# Altium PCB NB3000XN.PcbDoc (part 34 of 71)
Units mil, origin at the board's own origin, x right, y up, seen from the top; angles counter-clockwise.
Board outline 9527.56 x 6929.77 mil, 6 copper layers (Top Layer, GND+SHIELD, MidLayer1, MidLayer2, P2 - 3V3+5V0, Bottom Layer), stack 62.375 mil thick; 832 components, 1027 nets, 4655 pads, 4981 vias.
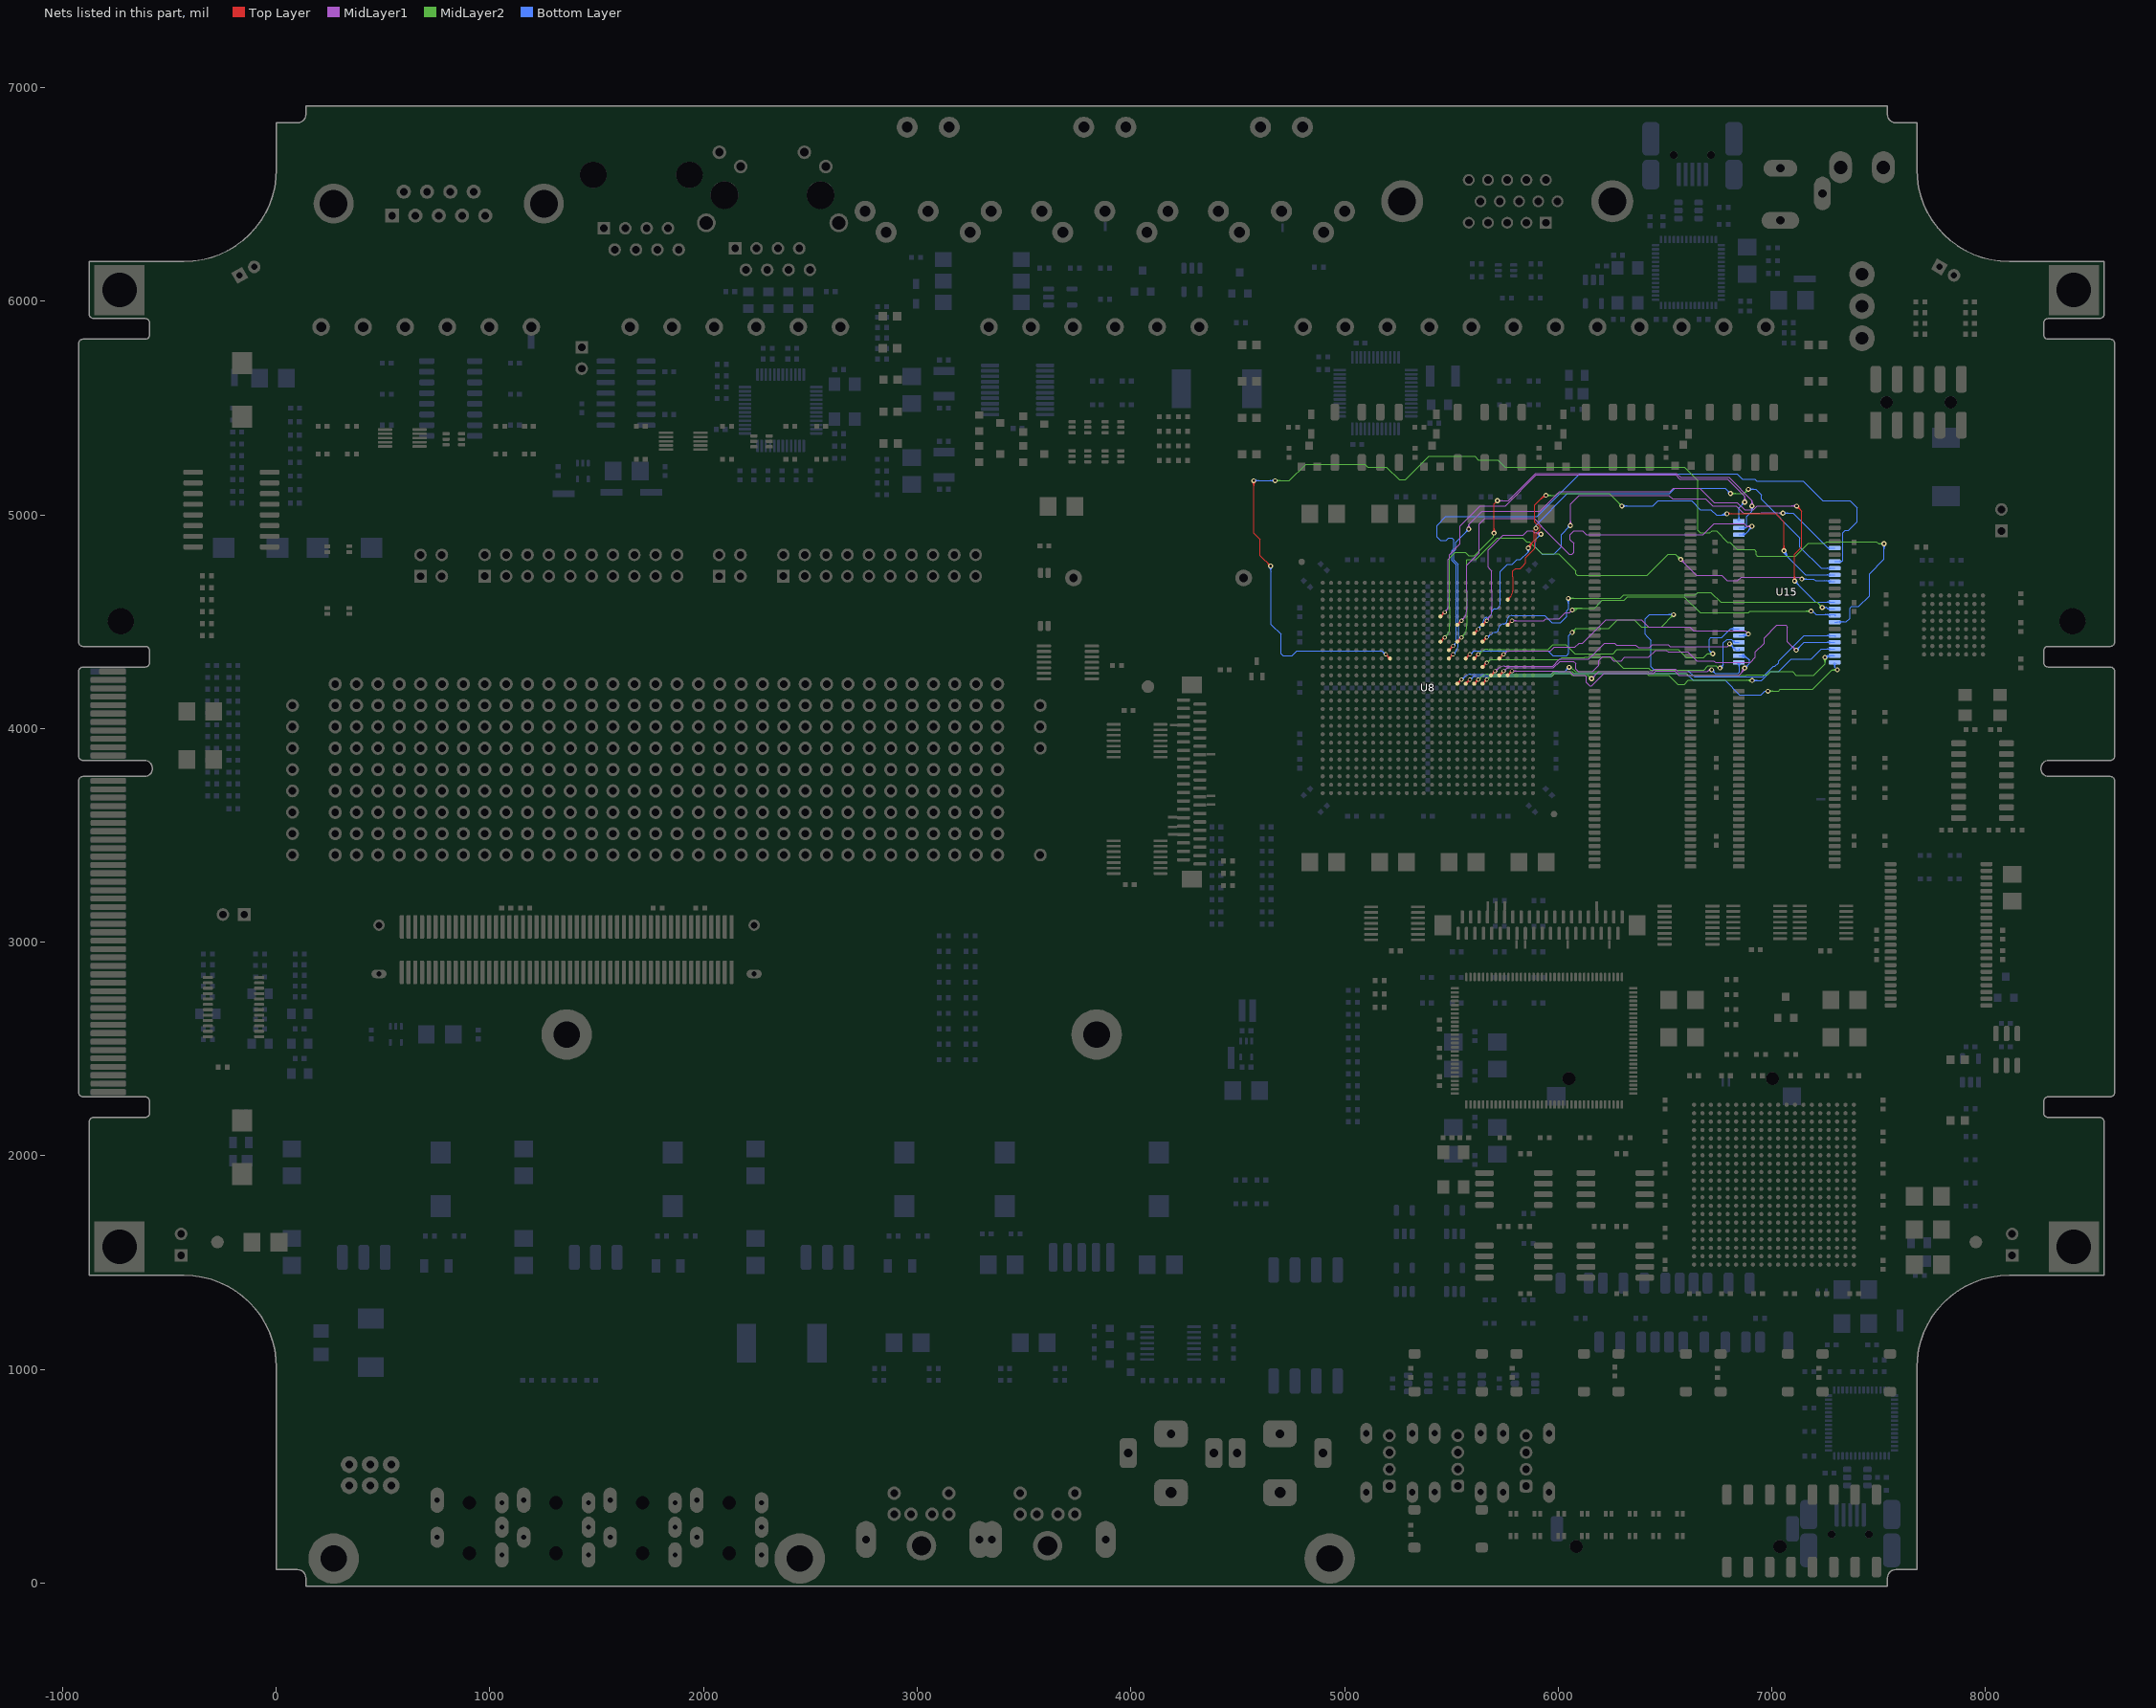
[diagram p38: the nets of this part, all layers, seen from the top]

## Via types
v1: diameter 23, hole 11.81, Top Layer to Bottom Layer, 3672 vias
v2: diameter 26, hole 11.81, Top Layer to Bottom Layer, 461 vias
v3: diameter 19, hole 11.81, Top Layer to Bottom Layer, tented both sides, 396 vias
v4: diameter 23.62, hole 11.81, Top Layer to Bottom Layer, 288 vias
v5: diameter 20, hole 11.81, Top Layer to Bottom Layer, 91 vias
v6: diameter 23, hole 11.81, Top Layer to Bottom Layer, tented both sides, 50 vias
v7: diameter 31, hole 11.81, Top Layer to Bottom Layer, 15 vias
v8: diameter 27.56, hole 11.81, Top Layer to Bottom Layer, tented both sides, 4 vias
v9: diameter 29, hole 11.81, Top Layer to Bottom Layer, 3 vias
v10: diameter 21, hole 11.81, Top Layer to Bottom Layer, 1 vias

## Nets (pads, with @x,y where several pads share a name; then routed paths per layer and width w, separated by ;. In a path a pad name is that pad's centre, name@x,y a point inside that pad or via, vN(x,y) a via of type N, cw(c..) or ccw(c..) an arc to the next point about the centre after c; other vN are vias at no path point) (continued)
DB_SRAM2.A4: U8.F20 U15.5 | length 2940.1
  Top Layer w4: U8.F20@5645.91,4485.28 v3(5665.59,4504.96) ; U8.F20@5645.91,4492.62 ccw(c5645.91,4510.34) 5658.44,4497.81 ccw(c5670.97,4485.28) U8.F20@5653.25,4485.28 ; U8.F20@5645.91,4492.78 ccw(c5645.91,4510.88) 5658.71,4498.08 ccw(c5671.51,4485.28) U8.F20@5653.41,4485.28 ; 5652.79,4492.16 cw(c5665.59,4479.35) 5665.59,4497.46 ccw(c5665.59,4479.35) 5652.79,4492.16 ; 5652.79,4492.16 ccw(c5639.98,4504.96) 5658.09,4504.96 cw(c5639.98,4504.96) 5652.79,4492.16
  MidLayer1 w4: v3@5664.29,4512.35 ccw(c5661.14,4530.18) 5675.98,4519.79 ; v3@5672.98,4506.26 cw(c5690.81,4509.41) 5675.98,4519.79 ; 5689.45,4581.77 5689.45,4567.84 ; 5896.15,4916.71 cw(c5896.15,4892.81) v1@5915.54,4906.78 ; 5903.96,4916.71 cw(c5903.96,4898.44) v1@5918.78,4909.12 ; v1@5912.29,4904.44 ccw(c5888.33,4887.17) 5888.33,4916.71 ; v1(5920,4910) 5920,4910.23 5913.52,4916.71 5888.33,4916.71 ; v1@6050.14,4956.76 ccw(c6032.37,4974.53) 6057.5,4974.53 ; v1@6052.97,4953.93 ccw(c6042.03,4964.87) 6057.5,4964.87 ; v1(6056.86,4950.04) 6057.5,4950.68 6057.5,5050.68 6098.52,5091.71 6518.17,5091.71 6534.84,5075.04 6690.19,5075.04 6723.52,5041.71 6831.86,5041.71 6865.86,5007.71 6944.52,5007.71 6948.52,5011.71 7030.04,5011.71 7033.37,5008.37 ; 6057.5,4961.77 ccw(c6068.58,4961.77) v1@6060.75,4953.93 ; 6057.5,4971.42 ccw(c6078.24,4971.42) v1@6063.57,4956.76 ; v1@7044.13,5002.85 ccw(c7033.38,4995.15) 7033.38,5008.37 ; v1@7044.13,5013.9 cw(c7033.38,5021.6) 7033.38,5008.37 ; v1(7051.86,5008.37) 7033.37,5008.37 ; 5675.98,4519.79 5683.06,4528.37 ccw(c5665.68,4544.59) 5689.45,4544.59 5689.45,4567.84 ; 5689.45,4567.84 5689.45,4641.96 5689.45,4661.38 5689.45,4710 5689.45,4720 5689.45,4724.74 5689.45,4737.45 5678.4,4748.5 5672.03,4754.87 5672.03,4835.25 5741.78,4905 5837.15,4905 5857.19,4925.04 5880,4925.04 5888.33,4916.71
  Bottom Layer w4: 5903.39,4893.62 cw(c5920,4877) v1@5920,4900.5 ; 5903.95,4894.18 ccw(c5888.13,4910) v1@5910.5,4910 ; 5910.21,4900.45 cw(c5920,4890.66) v1@5920,4904.5 ; 5910.77,4901.01 ccw(c5901.78,4910) v1@5914.5,4910 ; v1(5920,4910) 5920,4910.23 5892.61,4882.84 5892.61,4849.27 5925.17,4816.71 5979.88,4816.71 6015.52,4852.36 6015.52,4908.71 v1(6056.86,4950.04) ; v1@6047.36,4950.04 cw(c6024.42,4950.04) 6040.64,4933.82 cw(c6056.86,4917.61) v1@6056.86,4940.54 ; v1@6051.36,4950.04 cw(c6038.08,4950.04) 6047.47,4940.65 cw(c6056.86,4931.26) v1@6056.86,4944.54 ; v1(7051.86,5008.37) 7098.52,5008.37 7262.18,4844.72 ; v1@7055.75,5004.49 cw(c7065.14,4995.1) 7065.14,5008.37 cw(c7065.14,5021.65) v1@7055.75,5012.26 ; v1@7058.57,5001.66 cw(c7074.79,4985.44) 7074.79,5008.37 cw(c7074.79,5031.31) v1@7058.57,5015.09 ; U15.5@7270.13,4840.39 ccw(c7262.18,4835.27) 7262.18,4844.72 ; U15.5@7270.13,4849.06 cw(c7262.18,4854.18) 7262.18,4844.72 ; U15.5@7294.41,4844.72 7262.18,4844.72
DB_SRAM2.A5: U8.K18 U15.18 | length 2823.8
  Top Layer w4: U8.K18@5567.17,4327.8 v3(5586.85,4347.48) ; U8.K18@5567.17,4335.14 ccw(c5567.17,4352.86) 5579.7,4340.33 ccw(c5592.23,4327.8) U8.K18@5574.51,4327.8 ; U8.K18@5567.17,4335.3 ccw(c5567.17,4353.4) 5579.97,4340.6 ccw(c5592.77,4327.8) U8.K18@5574.67,4327.8 ; 5574.05,4334.68 cw(c5586.85,4321.87) 5586.85,4339.98 ccw(c5586.85,4321.87) 5574.05,4334.68 ; 5574.05,4334.68 ccw(c5561.24,4347.48) 5579.35,4347.48 cw(c5561.24,4347.48) 5574.05,4334.68
  MidLayer2 w4: v1(6065.19,4450.04) 6065.19,4451.04 6081.86,4467.71 ; v1@6065.19,4455.54 ccw(c6065.19,4466.4) 6072.87,4458.72 ; v1@6065.19,4459.54 ccw(c6065.19,4480.06) 6079.7,4465.55 ; v1@6070.69,4450.1 cw(c6085.85,4450.26) 6075.13,4460.98 ; v1@6074.69,4450.14 cw(c6099.16,4450.4) 6081.86,4467.71 ; v1@6530.69,4533.37 cw(c6507.76,4533.37) 6523.97,4517.16 cw(c6540.19,4500.94) v1@6540.19,4523.87 ; v1@6534.69,4533.37 cw(c6521.41,4533.37) 6530.8,4523.99 cw(c6540.19,4514.6) v1@6540.19,4527.87 ; v1(6540.19,4533.37) 6482.86,4476.04 6389.19,4476.04 6356.86,4508.37 6277.19,4508.37 6236.52,4467.71 6081.86,4467.71
  Bottom Layer w4: v3@5587.5,4354.95 ccw(c5589.08,4372.99) 5600.72,4359.12 ccw(c5612.36,4345.25) v3@5594.32,4346.83 ; 5600.43,4358.87 cw(c5610.36,4348.94) 5610.36,4362.99 5703.9,4362.99 5910,4362.99 5920,4362.99 5953.72,4362.99 5975,4341.71 6040.19,4341.71 6050,4351.52 6050,4434.85 v1(6065.19,4450.04) ; v1@6533.47,4526.66 ccw(c6517.26,4510.44) 6517.26,4533.37 ccw(c6517.26,4556.31) v1@6533.47,4540.09 ; v1@6536.3,4529.49 ccw(c6526.91,4520.1) 6526.91,4533.37 ccw(c6526.91,4546.65) v1@6536.3,4537.26 ; v1(6540.19,4533.37) 6428.37,4533.37 6407.72,4512.72 6407.72,4440.84 6415.23,4433.34 6435,4413.56 6435,4290 6450,4275 6604.88,4275 6637.17,4242.71 6957.86,4242.71 7006.86,4291.71 7015.19,4291.71 7031.86,4308.37 7031.86,4316.71 7141.26,4426.11 7150.42,4435.27 U15.18@7294.41,4435.27 7298.52,4435.28 7298.52,4433.37 U15.18@7294.41,4433.37 ; U15.18@7271.19,4429.62 ccw(c7257.54,4415.96) 7257.54,4435.27 ccw(c7257.54,4454.59) U15.18@7271.19,4440.93
DB_SRAM2.A6: U8.M22 U15.19 | length 2199.5
  Top Layer w4: U8.M22@5724.65,4249.06 v3(5744.33,4268.74) ; U8.M22@5724.65,4256.4 ccw(c5724.65,4274.12) 5737.18,4261.59 ccw(c5749.71,4249.06) U8.M22@5731.99,4249.06 ; U8.M22@5724.65,4256.56 ccw(c5724.65,4274.66) 5737.45,4261.86 ccw(c5750.25,4249.06) U8.M22@5732.15,4249.06 ; 5731.53,4255.94 cw(c5744.33,4243.13) 5744.33,4261.24 ccw(c5744.33,4243.13) 5731.53,4255.94 ; 5731.53,4255.94 ccw(c5718.72,4268.74) 5736.83,4268.74 cw(c5718.72,4268.74) 5731.53,4255.94
  MidLayer1 w4: v3@5744.98,4276.21 ccw(c5746.56,4294.25) 5758.2,4280.38 ccw(c5769.84,4266.51) v3@5751.8,4268.09 ; 5757.91,4280.13 cw(c5767.84,4270.2) 5767.84,4284.25 5861.38,4284.25 5910,4284.25 5920,4284.25 5978.06,4284.25 6007.86,4314.04 6072.52,4314.04 6081.86,4304.71 6081.86,4278.02 6093.5,4266.37 6161.19,4266.37 6190.19,4295.37 6190.19,4319.69 6205.5,4335 ; 6205.5,4335.71 6240.84,4335.71 6260.17,4316.37 6295.21,4316.37 6312.21,4333.37 6423.52,4333.37 6456.86,4366.71 6506.86,4366.71 6515.19,4358.37 6606.63,4358.37 6648.29,4316.71 6728.29,4316.71 6735.63,4309.37 6899.52,4309.37 6923.52,4333.37 6923.52,4358.37 6965.19,4400.04 6965.19,4425.04 7023.52,4483.37 7065.19,4483.37 7073.52,4475.04 7073.52,4407.04 v1(7113.86,4366.71) ; v1@7104.36,4366.71 ccw(c7081.42,4366.71) 7097.64,4382.93 ccw(c7113.86,4399.14) v1@7113.86,4376.21 ; v1@7108.36,4366.71 ccw(c7095.08,4366.71) 7104.47,4376.1 ccw(c7113.86,4385.49) v1@7113.86,4372.21
  Bottom Layer w4: v1(7113.86,4366.71) 7150.93,4403.78 U15.19@7293.97,4403.78 ; v1@7113.86,4372.21 ccw(c7113.86,4385.49) 7123.25,4376.1 ccw(c7132.64,4366.71) v1@7119.36,4366.71 ; v1@7113.86,4376.21 ccw(c7113.86,4399.14) 7130.07,4382.93 ccw(c7146.29,4366.71) v1@7123.36,4366.71 ; U15.19@7271.19,4398.12 ccw(c7257.54,4384.46) 7257.54,4403.78 ccw(c7257.54,4423.09) U15.19@7271.19,4409.44 ; U15.19@7293.97,4403.78 U15.19@7294.41,4403.78 U15.19@7293.97,4403.78
DB_SRAM2.A7: U8.N19 U15.20 | length 2062.7
  Top Layer w4: U8.N19@5606.54,4209.69 v3(5626.22,4229.37) ; U8.N19@5606.54,4217.03 ccw(c5606.54,4234.75) 5619.07,4222.22 ccw(c5631.6,4209.69) U8.N19@5613.88,4209.69 ; U8.N19@5606.54,4217.19 ccw(c5606.54,4235.29) 5619.34,4222.49 ccw(c5632.14,4209.69) U8.N19@5614.04,4209.69 ; 5613.42,4216.57 cw(c5626.22,4203.76) 5626.22,4221.87 ccw(c5626.22,4203.76) 5613.42,4216.57 ; 5613.42,4216.57 ccw(c5600.61,4229.37) 5618.72,4229.37 cw(c5600.61,4229.37) 5613.42,4216.57
  MidLayer2 w4: v3@5626.87,4236.84 ccw(c5628.45,4254.88) 5640.09,4241.01 ; v3@5633.69,4228.72 cw(c5651.73,4227.14) 5640.09,4241.01 ; 6422.96,4250 6422.92,4250.04 ; 6882.51,4226.04 cw(c6882.51,4199.69) v1@6901.14,4218.32 ; 6887.34,4226.04 ccw(c6887.34,4245.56) v1@6901.14,4231.76 ; 6892.16,4226.04 cw(c6892.16,4209.35) v1@6903.97,4221.15 ; v1(6907.86,4225.04) 6906.86,4226.04 6608.86,4226.04 6590.19,4207.37 6560.52,4207.37 6517.86,4250.04 6422.92,4250.04 ; 5640.09,4241.01 cw(c5669.6,4211.5) 5669.6,4253.23 5689.1,4253.23 5763.22,4253.23 5782.64,4253.23 5910,4253.23 5920,4253.23 5968.54,4253.23 5982.02,4266.71 6065.19,4266.71 6073.52,4258.37 6414.58,4258.37 6422.92,4250.04
  Bottom Layer w4: v1(6907.86,4225.04) 6952.19,4225.04 6993.52,4266.37 7031.52,4266.37 7090.19,4325.04 7184.62,4325.04 7231.86,4372.28 U15.20@7294.41,4372.28 ; v1@6911.75,4221.15 cw(c6921.14,4211.76) 6921.14,4225.04 cw(c6921.14,4238.32) v1@6911.75,4228.93 ; v1@6914.57,4218.32 cw(c6930.79,4202.11) 6930.79,4225.04 cw(c6930.79,4247.98) v1@6914.57,4231.76 ; U15.20@7271.19,4366.63 ccw(c7257.54,4352.97) 7257.54,4372.28 ccw(c7257.54,4391.6) U15.20@7271.19,4377.94
DB_SRAM2.A8: U8.N17 U15.21 | length 2255.6
  Top Layer w4: U8.N17@5527.8,4209.69 v3(5547.48,4229.37) ; U8.N17@5527.8,4217.03 ccw(c5527.8,4234.75) 5540.33,4222.22 ccw(c5552.86,4209.69) U8.N17@5535.14,4209.69 ; U8.N17@5527.8,4217.19 ccw(c5527.8,4235.29) 5540.6,4222.49 ccw(c5553.4,4209.69) U8.N17@5535.3,4209.69 ; 5534.68,4216.57 cw(c5547.48,4203.76) 5547.48,4221.87 ccw(c5547.48,4203.76) 5534.68,4216.57 ; 5534.68,4216.57 ccw(c5521.87,4229.37) 5539.98,4229.37 cw(c5521.87,4229.37) 5534.68,4216.57
  MidLayer2 w4: v1(6051.52,4287.04) 6059.19,4287.04 6079.52,4266.71 6370,4266.71 6417.56,4266.71 6425.9,4258.37 6599.86,4258.37 6609.86,4248.37 6879.52,4248.37 6881.86,4250.71 6977.86,4250.71 6993.86,4266.71 7096.19,4266.71 7112.86,4250.04 7195.19,4250.04 7248.52,4303.37 v1(7248.52,4333.37) ; v1@7241.81,4326.66 cw(c7225.59,4310.44) 7248.52,4310.44 cw(c7271.46,4310.44) v1@7255.24,4326.66 ; v1@7244.64,4329.49 cw(c7235.25,4320.1) 7248.52,4320.1 cw(c7261.8,4320.1) v1@7252.41,4329.49
  Bottom Layer w4: v3@5548.13,4236.84 ccw(c5549.71,4254.88) 5561.35,4241.01 ; v3@5554.95,4228.72 cw(c5572.99,4227.14) 5561.35,4241.01 ; v1@6042.02,4287.04 cw(c6019.09,4287.04) 6035.31,4270.82 cw(c6051.52,4254.61) v1@6051.52,4277.54 ; v1@6046.02,4287.04 cw(c6032.75,4287.04) 6042.13,4277.65 cw(c6051.52,4268.26) v1@6051.52,4281.54 ; v1(6051.52,4287.04) 6031.19,4266.71 5978.88,4266.71 5965.4,4253.23 5920,4253.23 5910,4253.23 5703.9,4253.23 5684.48,4253.23 5610.36,4253.23 5590.86,4253.23 ccw(c5590.86,4211.5) 5561.35,4241.01 ; v1@7246.76,4335.14 cw(c7260.38,4321.52) 7260.38,4340.79 ; v1(7248.52,4333.37) 7255.94,4340.79 U15.21@7294.41,4340.79 ; v1@7249.58,4332.31 cw(c7270.04,4311.86) U15.21@7270.04,4340.79 ; v1@7252.41,4329.49 cw(c7279.7,4302.2) U15.21@7279.7,4340.79 ; v1@7255.24,4326.66 cw(c7289.35,4292.55) U15.21@7289.35,4340.79 ; U15.21@7271.19,4335.13 ccw(c7257.54,4321.47) 7257.54,4340.79 ccw(c7257.54,4360.1) U15.21@7271.19,4346.44
DB_SRAM2.A9: U8.N18 U15.22 | length 2155.8
  Top Layer w4: U8.N18@5567.17,4209.69 v3(5586.85,4229.37) ; U8.N18@5567.17,4217.03 ccw(c5567.17,4234.75) 5579.7,4222.22 ccw(c5592.23,4209.69) U8.N18@5574.51,4209.69 ; U8.N18@5567.17,4217.19 ccw(c5567.17,4235.29) 5579.97,4222.49 ccw(c5592.77,4209.69) U8.N18@5574.67,4209.69 ; 5574.05,4216.57 cw(c5586.85,4203.76) 5586.85,4221.87 ccw(c5586.85,4203.76) 5574.05,4216.57 ; 5574.05,4216.57 ccw(c5561.24,4229.37) 5579.35,4229.37 cw(c5561.24,4229.37) 5574.05,4216.57
  MidLayer2 w4: v1(6981.86,4175.04) 7031.67,4175.04 7040,4183.37 7190.19,4183.37 7281.86,4275.04 v1(7306.86,4275.04) ; v1@6985.75,4171.15 cw(c6995.14,4161.76) 6995.14,4175.04 cw(c6995.14,4188.32) v1@6985.75,4178.93 ; v1@6988.57,4168.32 cw(c7004.79,4152.11) 7004.79,4175.04 cw(c7004.79,4197.98) v1@6988.57,4181.76 ; v1@7300.14,4268.32 ccw(c7283.92,4252.11) 7283.92,4275.04 ccw(c7283.92,4297.98) v1@7300.14,4281.76 ; v1@7302.97,4271.15 ccw(c7293.58,4261.76) 7293.58,4275.04 ccw(c7293.58,4288.32) v1@7302.97,4278.93
  Bottom Layer w4: v3@5587.5,4236.84 ccw(c5589.08,4254.88) 5600.72,4241.01 ccw(c5612.36,4227.14) v3@5594.32,4228.72 ; 5600.43,4240.76 cw(c5610.36,4230.83) 5610.36,4244.88 5703.9,4244.88 5910,4244.88 5920,4244.88 5924.74,4244.88 5968.36,4244.88 5981.86,4258.37 6598.88,4258.37 6631.21,4226.04 6780.86,4226.04 6848.52,4158.37 6950,4158.37 6966.67,4175.04 v1(6981.86,4175.04) ; U15.22@7288.75,4303.63 cw(c7275.1,4289.98) 7294.41,4289.98 cw(c7313.72,4289.98) U15.22@7300.07,4303.63 ; U15.22@7294.41,4309.29 7294.41,4287.49 v1(7306.86,4275.04)
DB_SRAM2.A10: U8.N20 U15.23 | length 1706.8
  Top Layer w4: U8.N20@5645.91,4209.69 v3(5665.59,4229.37) ; U8.N20@5645.91,4217.03 ccw(c5645.91,4234.75) 5658.44,4222.22 ccw(c5670.97,4209.69) U8.N20@5653.25,4209.69 ; U8.N20@5645.91,4217.19 ccw(c5645.91,4235.29) 5658.71,4222.49 ccw(c5671.51,4209.69) U8.N20@5653.41,4209.69 ; 5652.79,4216.57 cw(c5665.59,4203.76) 5665.59,4221.87 ccw(c5665.59,4203.76) 5652.79,4216.57 ; 5652.79,4216.57 ccw(c5639.98,4229.37) 5658.09,4229.37 cw(c5639.98,4229.37) 5652.79,4216.57
  MidLayer1 w4: v1(6156.86,4233.37) 6190.19,4266.71 6441.71,4266.71 6453.54,4278.54 6548.01,4278.54 6559.84,4266.71 6698.52,4266.71 6706.86,4275.04 v1(6718.19,4275.04) ; v1@6156.86,4238.87 ccw(c6156.86,4252.15) 6166.25,4242.76 ccw(c6175.64,4233.37) v1@6162.36,4233.37 ; v1@6156.86,4242.87 ccw(c6156.86,4265.81) 6173.07,4249.59 ccw(c6189.29,4233.37) v1@6166.36,4233.37 ; 6697.35,4265.53 cw(c6710.29,4252.6) v1@6716.36,4269.85 ; 6701.84,4270.02 cw(c6712.63,4259.24) v1@6717.69,4273.63 ; 6706.33,4274.52 cw(c6714.97,4265.88) v1@6719.02,4277.4
  MidLayer2 w4: v3@5666.24,4236.84 ccw(c5667.82,4254.88) 5679.46,4241.01 ccw(c5691.1,4227.14) v3@5673.06,4228.72 ; 5679.17,4240.76 cw(c5689.1,4230.83) 5689.1,4244.88 5782.64,4244.88 5910,4244.88 5920,4244.88 5971.5,4244.88 5985,4258.37 6056.86,4258.37 6065.19,4250.04 6115,4250.04 6140.23,4250 v1(6156.86,4233.37) ; v1@6147.36,4233.37 ccw(c6124.42,4233.37) 6140.64,4249.59 ccw(c6156.86,4265.81) v1@6156.86,4242.87 ; v1@6151.36,4233.37 ccw(c6138.08,4233.37) 6147.47,4242.76 ccw(c6156.86,4252.15) v1@6156.86,4238.87
  Bottom Layer w4: v1@6718.19,4265.54 cw(c6718.19,4242.61) 6734.41,4258.82 cw(c6750.63,4275.04) v1@6727.69,4275.04 ; v1@6718.19,4269.54 cw(c6718.19,4256.26) 6727.58,4265.65 cw(c6736.97,4275.04) v1@6723.69,4275.04 ; v1(6718.19,4275.04) 6734.52,4258.71 6841.29,4258.71 6848.52,4265.94 6848.52,4309.29 U15.23@6845.59,4309.29 ; U15.23@6839.93,4303.63 cw(c6819.19,4282.89) 6848.52,4282.89 ; U15.23@6842.76,4306.46 cw(c6828.85,4292.55) 6848.52,4292.55 ; 6848.52,4297.06 cw(c6857.82,4297.06) U15.23@6851.25,4303.63
DB_SRAM2.A11: U8.M23 U15.24 | length 1719.9
  Top Layer w4: U8.M23@5764.02,4249.06 v3(5783.7,4268.74) ; U8.M23@5764.02,4256.4 ccw(c5764.02,4274.12) 5776.55,4261.59 ccw(c5789.08,4249.06) U8.M23@5771.36,4249.06 ; U8.M23@5764.02,4256.56 ccw(c5764.02,4274.66) 5776.82,4261.86 ccw(c5789.62,4249.06) U8.M23@5771.52,4249.06 ; 5770.9,4255.94 cw(c5783.7,4243.13) 5783.7,4261.24 ccw(c5783.7,4243.13) 5770.9,4255.94 ; 5770.9,4255.94 ccw(c5758.09,4268.74) 5776.2,4268.74 cw(c5758.09,4268.74) 5770.9,4255.94
  MidLayer1 w4: v3(5783.7,4268.74) 5861.38,4268.74 5910,4268.74 5920,4268.74 5997.97,4268.74 6000,4266.71 6053.86,4266.71 6070.52,4250.04 6123.86,4250.04 6131.86,4242.04 6131.86,4216.71 6148.52,4200.04 6156.86,4200.04 6215.19,4258.37 6444.69,4258.37 6456.85,4270.54 6544.7,4270.54 6545.52,4269.71 6565.19,4250.04 6846.86,4250.04 6873.52,4276.71 v1(6873.52,4283.37) ; v3@5788.89,4263.55 cw(c5801.43,4251.01) 5801.43,4268.74 cw(c5801.43,4286.47) v3@5788.89,4273.93 ; v3@5789,4263.44 cw(c5801.81,4250.63) 5801.81,4268.74 cw(c5801.81,4286.85) v3@5789,4274.04 ; 6852.59,4255.78 ccw(c6824.99,4283.37) v1@6864.02,4283.37 ; 6859.42,4262.6 ccw(c6838.65,4283.37) v1@6868.02,4283.37 ; 6866.25,4269.43 ccw(c6852.31,4283.37) v1@6872.02,4283.37 ; 6868.69,4271.87 cw(c6873.52,4267.04) v1@6873.52,4273.87
  Bottom Layer w4: U15.24@6845.59,4340.79 6874.21,4340.79 6895,4320 6895,4304.85 v1(6873.52,4283.37) ; U15.24@6863.15,4332.79 cw(c6863.15,4286.76) 6895.69,4319.31 ; U15.24@6863.15,4336.79 cw(c6863.15,4300.42) 6888.86,4326.14 ; U15.24@6863.15,4340.79 cw(c6863.15,4314.08) 6882.04,4332.96 ; U15.24@6863.15,4344.79 cw(c6863.15,4327.73) 6875.21,4339.79 ; v1@6873.52,4288.87 ccw(c6873.52,4302.15) 6882.91,4292.76 ccw(c6892.3,4283.37) v1@6879.02,4283.37 ; v1@6873.52,4292.87 ccw(c6873.52,4315.81) 6889.74,4299.59 ccw(c6905.96,4283.37) v1@6883.02,4283.37
DB_SRAM2.A12: U8.M21 U15.25 | length 1505.3
  Top Layer w4: U8.M21@5685.28,4249.06 v3(5704.96,4268.74) ; U8.M21@5685.28,4256.4 ccw(c5685.28,4274.12) 5697.81,4261.59 ccw(c5710.34,4249.06) U8.M21@5692.62,4249.06 ; U8.M21@5685.28,4256.56 ccw(c5685.28,4274.66) 5698.08,4261.86 ccw(c5710.88,4249.06) U8.M21@5692.78,4249.06 ; 5692.16,4255.94 cw(c5704.96,4243.13) 5704.96,4261.24 ccw(c5704.96,4243.13) 5692.16,4255.94 ; 5692.16,4255.94 ccw(c5679.35,4268.74) 5697.46,4268.74 cw(c5679.35,4268.74) 5692.16,4255.94
  MidLayer1 w4: v3@5705.61,4276.21 ccw(c5707.19,4294.25) 5718.83,4280.38 ; v3@5712.43,4268.09 cw(c5730.47,4266.51) 5718.83,4280.38 ; 5781.77,4292.6 5767.84,4292.6 ; v1(6802.19,4396.71) 6802.19,4391.71 6793.69,4383.21 6524.3,4383.21 6515.8,4391.71 6441.88,4391.71 6428.54,4378.37 6375.84,4378.37 6363.17,4391.04 6273.52,4391.04 6265.19,4399.37 6217.5,4399.37 6143.17,4325.04 6007.52,4325.04 5975.09,4292.6 5920,4292.6 5910,4292.6 5861.38,4292.6 5841.96,4292.6 5767.84,4292.6 ; 5718.83,4280.38 cw(c5748.34,4250.87) 5748.34,4292.6 5767.84,4292.6
  Bottom Layer w4: v1@6802.19,4387.21 cw(c6802.19,4364.27) 6818.41,4380.49 cw(c6834.63,4396.71) v1@6811.69,4396.71 ; v1@6802.19,4391.21 cw(c6802.19,4377.93) 6811.58,4387.32 cw(c6820.97,4396.71) v1@6807.69,4396.71 ; v1(6802.19,4396.71) 6832.19,4366.71 6845.59,4366.71 6848.52,4366.71 6848.52,4372.28 U15.25@6845.59,4372.28 ; 6811.96,4386.94 ccw(c6828.03,4403.02) U15.25@6828.03,4380.28 ; 6815.38,4383.52 cw(c6804.14,4372.28) U15.25@6820.03,4372.28 ; 6818.79,4380.11 ccw(c6828.03,4389.36) U15.25@6828.03,4376.28
DB_SRAM2.A13: U8.L20 U15.26 | length 1585.2
  Top Layer w4: U8.L20@5645.91,4288.43 v3(5665.59,4308.11) ; U8.L20@5645.91,4295.77 ccw(c5645.91,4313.49) 5658.44,4300.96 ccw(c5670.97,4288.43) U8.L20@5653.25,4288.43 ; U8.L20@5645.91,4295.93 ccw(c5645.91,4314.03) 5658.71,4301.23 ccw(c5671.51,4288.43) U8.L20@5653.41,4288.43 ; 5652.79,4295.31 cw(c5665.59,4282.5) 5665.59,4300.61 ccw(c5665.59,4282.5) 5652.79,4295.31 ; 5652.79,4295.31 ccw(c5639.98,4308.11) 5658.09,4308.11 cw(c5639.98,4308.11) 5652.79,4295.31
  MidLayer2 w4: v3@5666.24,4315.58 ccw(c5667.82,4333.62) 5679.46,4319.75 ccw(c5691.1,4305.88) v3@5673.06,4307.46 ; 5679.17,4319.5 cw(c5689.1,4309.57) 5689.1,4323.62 5782.64,4323.62 5910,4323.62 5920,4323.62 5924.74,4323.62 6008.43,4323.62 6017.52,4332.71 6123.19,4332.71 6125.19,4334.71 6252.19,4334.71 6303.52,4283.37 6423.52,4283.37 6431.86,4275.04 6681.86,4275.04 6700.19,4293.37 6738.52,4293.37 6748.52,4283.37 v1(6757.52,4283.37)
  Bottom Layer w4: v1(6757.52,4283.37) 6773.52,4299.37 ; v1@6757.58,4288.87 ccw(c6757.7,4301.72) 6766.79,4292.64 ccw(c6775.87,4283.55) v1@6763.02,4283.43 ; v1@6757.62,4292.87 ccw(c6757.83,4315.07) 6773.52,4299.37 ; v1@6767.02,4283.47 cw(c6789.22,4283.68) 6773.52,4299.37 ; 6812.39,4414.66 ccw(c6821.68,4423.95) U15.26@6825.63,4411.41 ; 6817.05,4409.99 ccw(c6823.92,4416.86) U15.26@6826.83,4407.59 ; 6817.75,4409.29 cw(c6812.23,4403.78) U15.26@6820.03,4403.78 ; U15.26@6845.59,4403.78 6823.26,4403.78 6810,4417.04 6789.52,4417.04 6773.52,4401.04 6773.52,4299.37
DB_SRAM2.A14: U8.K22 U15.27 | length 1574.5
  Top Layer w4: U8.K22@5724.65,4327.8 v3(5744.33,4347.48) ; U8.K22@5724.65,4335.14 ccw(c5724.65,4352.86) 5737.18,4340.33 ccw(c5749.71,4327.8) U8.K22@5731.99,4327.8 ; U8.K22@5724.65,4335.3 ccw(c5724.65,4353.4) 5737.45,4340.6 ccw(c5750.25,4327.8) U8.K22@5732.15,4327.8 ; 5731.53,4334.68 cw(c5744.33,4321.87) 5744.33,4339.98 ccw(c5744.33,4321.87) 5731.53,4334.68 ; 5731.53,4334.68 ccw(c5718.72,4347.48) 5736.83,4347.48 cw(c5718.72,4347.48) 5731.53,4334.68
  MidLayer1 w4: v3@5744.98,4354.95 ccw(c5746.56,4372.99) 5758.2,4359.12 ccw(c5769.84,4345.25) v3@5751.8,4346.83 ; 5757.91,4358.87 cw(c5767.84,4348.94) 5767.84,4362.99 5861.38,4362.99 5910,4362.99 5920,4362.99 5964.39,4362.99 5982.11,4380.71 6079.19,4380.71 6098.52,4400.04 6115.19,4400.04 6223.52,4508.37 6390.19,4508.37 6422.52,4476.04 6615.19,4476.04 6632.86,4458.37 6874.52,4458.37 v1(6890.19,4442.71)
  Bottom Layer w4: U15.27@6845.59,4435.27 6882.76,4435.27 v1(6890.19,4442.71) ; U15.27@6849.31,4435.27 ccw(c6849.31,4483.59) v1@6883.47,4449.43 ; U15.27@6858.97,4435.27 ccw(c6858.97,4473.93) v1@6886.3,4446.6 ; U15.27@6868.62,4435.27 ccw(c6868.62,4464.27) v1@6889.13,4443.77 ; U15.27@6868.81,4429.62 cw(c6882.46,4415.96) 6882.46,4435.27 cw(c6882.46,4454.59) U15.27@6868.81,4440.93 ; 6878.28,4435.27 ccw(c6878.28,4454.62) v1@6891.96,4440.94
DB_SRAM2.A15: U8.F17 U15.42 | length 2387
  Top Layer w4: U8.F17@5527.8,4485.28 v3(5547.48,4504.96) ; U8.F17@5527.8,4492.62 ccw(c5527.8,4510.34) 5540.33,4497.81 ccw(c5552.86,4485.28) U8.F17@5535.14,4485.28 ; U8.F17@5527.8,4492.78 ccw(c5527.8,4510.88) 5540.6,4498.08 ccw(c5553.4,4485.28) U8.F17@5535.3,4485.28 ; 5534.68,4492.16 cw(c5547.48,4479.35) 5547.48,4497.46 ccw(c5547.48,4479.35) 5534.68,4492.16 ; 5534.68,4492.16 ccw(c5521.87,4504.96) 5539.98,4504.96 cw(c5521.87,4504.96) 5534.68,4492.16
  MidLayer1 w4: v3@5546.83,4512.43 ccw(c5545.25,4530.47) 5559.12,4518.83 ; v3@5554.95,4505.61 cw(c5572.99,4507.19) 5559.12,4518.83 ; 5571.34,4581.77 5571.34,4567.84 ; v1@6900.14,4939.99 ccw(c6883.92,4923.77) 6883.92,4946.71 ccw(c6883.92,4969.64) v1@6900.14,4953.43 ; v1@6902.97,4942.82 ccw(c6893.58,4933.43) 6893.58,4946.71 ccw(c6893.58,4959.99) v1@6902.97,4950.6 ; v1(6906.86,4946.71) 6882.92,4946.71 6871.25,4958.37 6728.86,4958.37 6678.86,4908.37 6131.86,4908.37 6115.19,4925.04 6073.52,4925.04 6056.86,4908.37 6056.86,4883.71 6073.52,4867.04 6073.52,4824.71 6065.52,4816.71 6051.52,4816.71 5921.81,4946.42 5921.81,4948.57 5887.01,4983.37 5658.37,4983.37 5631.02,4956.02 5631.02,4823.37 5571.34,4763.69 5571.34,4724.74 5571.34,4720 5571.34,4710 5571.34,4661.38 5571.34,4641.96 5571.34,4567.84 ; 5559.12,4518.83 ccw(c5529.61,4548.34) 5571.34,4548.34 5571.34,4567.84
  Bottom Layer w4: U15.42@6845.59,4907.72 6873.15,4907.72 6881.15,4915.72 ; U15.42@6863.15,4907.72 ccw(c6868.03,4915.04) 6874.25,4908.82 ; U15.42@6865.37,4911.04 ccw(c6870.79,4919.18) 6877.7,4912.27 ; U15.42@6867.59,4914.37 ccw(c6873.55,4923.32) 6881.15,4915.72 ; 6888.05,4924.23 ccw(c6865.57,4946.71) v1@6897.36,4946.71 ; 6894.88,4931.06 ccw(c6879.23,4946.71) v1@6901.36,4946.71 ; 6896.9,4933.08 cw(c6906.86,4923.13) v1@6906.86,4937.21 ; v1(6906.86,4946.71) 6906.86,4943.04 6881.15,4917.33 6881.15,4915.72
DB_SRAM2.A16: U8.H15 U15.43 | length 2748.8
  Top Layer w4: U8.H15@5449.06,4406.54 v3(5468.74,4426.22) ; U8.H15@5449.06,4413.88 ccw(c5449.06,4431.6) 5461.59,4419.07 ccw(c5474.12,4406.54) U8.H15@5456.4,4406.54 ; U8.H15@5449.06,4414.04 ccw(c5449.06,4432.14) 5461.86,4419.34 ccw(c5474.66,4406.54) U8.H15@5456.56,4406.54 ; v1@5693.28,4921.72 ccw(c5677.06,4937.93) 5700,4937.93 ccw(c5722.93,4937.93) v1@5706.72,4921.72 ; v1@5696.11,4918.89 ccw(c5686.72,4928.28) 5700,4928.28 ccw(c5713.28,4928.28) v1@5703.89,4918.89 ; v1@5698.52,4915.71 5699.23,4915 v1(5700,4915) 5700,5051.52 v1(5715.19,5066.71) ; 5455.94,4413.42 cw(c5468.74,4400.61) 5468.74,4418.72 ccw(c5468.74,4400.61) 5455.94,4413.42 ; 5455.94,4413.42 ccw(c5443.13,4426.22) 5461.24,4426.22 cw(c5443.13,4426.22) 5455.94,4413.42
  MidLayer1 w4: v1(5715.19,5066.71) 5766.52,5066.71 5894.52,5194.71 6553.54,5194.71 6572.21,5176.04 6798.52,5176.04 6906.86,5067.71 v1(6906.86,5041.71) ; v1@5719.08,5062.82 cw(c5728.47,5053.43) 5728.47,5066.71 cw(c5728.47,5079.99) v1@5719.08,5070.6 ; v1@5721.91,5059.99 cw(c5738.13,5043.77) 5738.13,5066.71 cw(c5738.13,5089.64) v1@5721.91,5073.43 ; v1@6900.14,5048.43 ccw(c6883.92,5064.64) 6906.86,5064.64 ccw(c6929.79,5064.64) v1@6913.57,5048.43 ; v1@6902.97,5045.6 ccw(c6893.58,5054.99) 6906.86,5054.99 ccw(c6920.14,5054.99) v1@6910.75,5045.6
  MidLayer2 w4: v3@5468.09,4433.69 ccw(c5466.51,4451.73) 5480.38,4440.09 ; v3@5476.21,4426.87 cw(c5494.25,4428.45) 5480.38,4440.09 ; 5492.6,4699.16 5492.6,4640.9 ; v1(5700,4915) 5699.23,4915 5698.52,4915.71 5698.52,4898.37 5608.86,4808.71 5581.88,4808.71 5565.54,4825.04 5518.86,4825.04 5492.6,4798.79 5492.6,4724.74 5492.6,4720 5492.6,4710 5492.6,4640.9 ; 5480.38,4440.09 ccw(c5450.87,4469.6) 5492.6,4469.6 5492.6,4489.1 5492.6,4563.22 5492.6,4582.64 5492.6,4640.9
  Bottom Layer w4: U15.43@6845.59,4939.21 6878.82,4939.21 ; U15.43@6869.63,4934.52 cw(c6878.82,4927.87) 6878.82,4939.21 ; U15.43@6869.63,4943.9 ccw(c6878.82,4950.55) 6878.82,4939.21 ; v1@6900.14,5034.99 cw(c6883.92,5018.77) 6906.86,5018.77 cw(c6929.79,5018.77) v1@6913.57,5034.99 ; v1@6902.97,5037.82 cw(c6893.58,5028.43) 6906.86,5028.43 cw(c6920.14,5028.43) v1@6910.75,5037.82 ; v1(6906.86,5041.71) 6906.86,5017.41 6881.15,4991.71 6881.15,4941.54 6878.82,4939.21
DB_SRAM2.A17: U8.E15 U15.44 | length 2342.1
  Top Layer w4: U8.E15@5449.06,4524.65 v3(5468.74,4544.33) ; U8.E15@5449.06,4531.99 ccw(c5449.06,4549.71) 5461.59,4537.18 ccw(c5474.12,4524.65) U8.E15@5456.4,4524.65 ; U8.E15@5449.06,4532.15 ccw(c5449.06,4550.25) 5461.86,4537.45 ccw(c5474.66,4524.65) U8.E15@5456.56,4524.65 ; 5455.94,4531.53 cw(c5468.74,4518.72) 5468.74,4536.83 ccw(c5468.74,4518.72) 5455.94,4531.53 ; 5455.94,4531.53 ccw(c5443.13,4544.33) 5461.24,4544.33 cw(c5443.13,4544.33) 5455.94,4531.53
  MidLayer1 w4: v3@5468.09,4551.8 ccw(c5466.51,4569.84) 5480.38,4558.2 ccw(c5494.25,4546.56) v3@5476.21,4544.98 ; 5480.13,4557.91 ccw(c5470.2,4567.84) 5484.25,4567.84 ; 5484.25,4581.77 5484.25,4567.84 ; v1@6866.81,5066.76 ccw(c6850.59,5082.98) 6873.52,5082.98 ccw(c6896.46,5082.98) v1@6880.24,5066.76 ; v1@6869.64,5063.93 ccw(c6860.25,5073.32) 6873.52,5073.32 ccw(c6886.8,5073.32) v1@6877.41,5063.93 ; v1(6873.52,5060.04) 6873.52,5086.04 6791.52,5168.04 6568.9,5168.04 6550.23,5186.71 5897.84,5186.71 5752.84,5041.71 5634.84,5041.71 5610.01,5016.88 5540.19,4947.06 5540.19,4864.33 5490.5,4814.64 5490.5,4797.37 5484.25,4791.12 5484.25,4724.74 5484.25,4720 5484.25,4710 5484.25,4661.38 5484.25,4567.84
  Bottom Layer w4: U15.44@6839.93,4976.36 ccw(c6826.28,4990.02) 6845.59,4990.02 ccw(c6864.9,4990.02) U15.44@6851.25,4976.36 ; U15.44@6845.59,4970.71 6845.59,5032.11 v1(6873.52,5060.04) ; v1@6864.02,5060.04 cw(c6841.09,5060.04) 6857.31,5043.82 cw(c6873.52,5027.61) v1@6873.52,5050.54 ; v1@6868.02,5060.04 cw(c6854.75,5060.04) 6864.14,5050.65 cw(c6873.52,5041.26) v1@6873.52,5054.54
DB_SRAM2.A18: U8.K19 U15.28 | length 1692.4
  Top Layer w4: U8.K19@5606.54,4327.8 v3(5626.22,4347.48) ; U8.K19@5606.54,4335.14 ccw(c5606.54,4352.86) 5619.07,4340.33 ccw(c5631.6,4327.8) U8.K19@5613.88,4327.8 ; U8.K19@5606.54,4335.3 ccw(c5606.54,4353.4) 5619.34,4340.6 ccw(c5632.14,4327.8) U8.K19@5614.04,4327.8 ; 5613.42,4334.68 cw(c5626.22,4321.87) 5626.22,4339.98 ccw(c5626.22,4321.87) 5613.42,4334.68 ; 5613.42,4334.68 ccw(c5600.61,4347.48) 5618.72,4347.48 cw(c5600.61,4347.48) 5613.42,4334.68
  MidLayer2 w4: v3@5626.87,4354.95 ccw(c5628.45,4372.99) 5640.09,4359.12 ; v3@5633.69,4346.83 cw(c5651.73,4345.25) 5640.09,4359.12 ; v1@6716.81,4343.32 ccw(c6700.59,4327.11) 6700.59,4350.04 ccw(c6700.59,4372.98) v1@6716.81,4356.76 ; v1@6719.64,4346.15 ccw(c6710.25,4336.76) 6710.25,4350.04 ccw(c6710.25,4363.32) v1@6719.64,4353.93 ; v1(6723.52,4350.04) 6698.67,4350.04 6680,4331.37 6600.52,4331.37 6562.19,4369.71 6275.52,4369.71 6256.86,4351.04 6108.86,4351.04 6106.86,4349.04 6078.19,4349.04 6035.52,4391.71 5974.19,4391.71 5953.83,4371.34 5920,4371.34 5910,4371.34 5782.64,4371.34 5763.22,4371.34 5689.1,4371.34 5669.6,4371.34 ccw(c5669.6,4329.61) 5640.09,4359.12
  Bottom Layer w4: v1@6714.02,4350.04 ccw(c6691.09,4350.04) 6707.31,4366.26 ccw(c6723.52,4382.48) v1@6723.52,4359.54 ; v1@6718.02,4350.04 ccw(c6704.75,4350.04) 6714.14,4359.43 ccw(c6723.52,4368.82) v1@6723.52,4355.54 ; v1(6723.52,4350.04) 6706.86,4366.71 6706.86,4418.04 6715.19,4426.37 6765.19,4426.37 6794.01,4455.19 6805.59,4466.77 U15.28@6845.59,4466.77 ; U15.28@6822.37,4461.11 ccw(c6808.72,4447.46) 6808.72,4466.77 ccw(c6808.72,4486.08) U15.28@6822.37,4472.43
DB_SRAM2.D0: U8.J16 U15.7 | length 3287.8
  Top Layer w4: U8.J16@5488.43,4367.17 v3(5508.11,4386.85) ; U8.J16@5488.43,4374.51 ccw(c5488.43,4392.23) 5500.96,4379.7 ccw(c5513.49,4367.17) U8.J16@5495.77,4367.17 ; U8.J16@5488.43,4374.67 ccw(c5488.43,4392.77) 5501.23,4379.97 ccw(c5514.03,4367.17) U8.J16@5495.93,4367.17 ; 5495.31,4374.05 cw(c5508.11,4361.24) 5508.11,4379.35 ccw(c5508.11,4361.24) 5495.31,4374.05 ; 5495.31,4374.05 ccw(c5482.5,4386.85) 5500.61,4386.85 cw(c5482.5,4386.85) 5495.31,4374.05
  Bottom Layer w4: v3@5507.46,4394.32 ccw(c5505.88,4412.36) 5519.75,4400.72 ccw(c5533.62,4389.08) v3@5515.58,4387.5 ; 5519.5,4400.43 ccw(c5509.57,4410.36) 5523.62,4410.36 5523.62,4503.9 5523.62,4710 5523.62,4720 5523.62,4765.63 5502.19,4787.06 5502.19,4832.02 5512.5,4842.33 5512.5,4882.25 5502.25,4892.5 5487.75,4892.5 5476.25,4881 5449.5,4881 5433.19,4897.31 5433.19,4951.37 5473.52,4991.71 5900.9,4991.71 6101.23,5192.04 6836.52,5192.04 6861.86,5166.71 6921.15,5166.71 6929.48,5158.37 7145.54,5158.37 7237.21,5066.71 7365.19,5066.71 7398.52,5033.37 7398.52,4967.71 7358.52,4927.71 7342.86,4927.71 7331.86,4916.71 7331.86,4786.73 7326.86,4781.73 ; U15.7@7294.41,4781.73 7326.86,4781.73 ; U15.7@7318.64,4777.32 cw(c7326.86,4771.88) 7326.86,4781.73 ; U15.7@7318.64,4786.15 ccw(c7326.86,4791.58) 7326.86,4781.73
DB_SRAM2.D1: U8.G19 U15.8 | length 2820.8
  Top Layer w4: U8.G19@5606.54,4445.91 v3(5626.22,4465.59) ; U8.G19@5606.54,4453.25 ccw(c5606.54,4470.97) 5619.07,4458.44 ccw(c5631.6,4445.91) U8.G19@5613.88,4445.91 ; U8.G19@5606.54,4453.41 ccw(c5606.54,4471.51) 5619.34,4458.71 ccw(c5632.14,4445.91) U8.G19@5614.04,4445.91 ; v4(5860,4845) 5860,4853.58 5888.02,4881.6 5888.02,4929.9 v4(5896,4937.88) ; v4@5861.81,4845 cw(c5886.89,4845) 5869.16,4862.74 ; v4@5865.81,4845 cw(c5900.55,4845) 5875.99,4869.57 ; v4@5869.81,4845 cw(c5914.21,4845) 5882.81,4876.39 ; 5613.42,4452.79 cw(c5626.22,4439.98) 5626.22,4458.09 ccw(c5626.22,4439.98) 5613.42,4452.79 ; 5613.42,4452.79 ccw(c5600.61,4465.59) 5618.72,4465.59 cw(c5600.61,4465.59) 5613.42,4452.79
  MidLayer2 w4: v1(6806.86,5100.04) 6870.19,5100.04 v1(6890.19,5120.04) ; v1@6810.75,5096.15 cw(c6820.14,5086.76) 6820.14,5100.04 cw(c6820.14,5113.32) v1@6810.75,5103.93 ; v1@6813.57,5093.32 cw(c6829.79,5077.11) 6829.79,5100.04 cw(c6829.79,5122.98) v1@6813.57,5106.76 ; v1@6880.69,5120.04 cw(c6857.76,5120.04) 6873.97,5103.82 cw(c6890.19,5087.61) v1@6890.19,5110.54 ; v1@6884.69,5120.04 cw(c6871.41,5120.04) 6880.8,5110.65 cw(c6890.19,5101.26) v1@6890.19,5114.54
  Bottom Layer w4: v3@5624.92,4472.98 ccw(c5621.77,4490.81) 5636.61,4480.42 ; v3@5633.61,4466.89 cw(c5651.44,4470.04) 5636.61,4480.42 ; v4@5855.17,4836.46 cw(c5850.49,4828.18) 5860,4828.18 ; v4(5860,4845) 5860,4828.18 ; v4@5864.83,4836.46 ccw(c5869.51,4828.18) 5860,4828.18 ; v4(5896,4937.88) 5896,4952.85 6043.19,5100.04 6521.15,5100.04 6546.15,5125.04 6781.86,5125.04 v1(6806.86,5100.04) ; v1@6797.36,5100.04 ccw(c6774.42,5100.04) 6790.64,5116.26 ccw(c6806.86,5132.48) v1@6806.86,5109.54 ; v1@6801.36,5100.04 ccw(c6788.08,5100.04) 6797.47,5109.43 ccw(c6806.86,5118.82) v1@6806.86,5105.54 ; v1(6890.19,5120.04) 6925,5120.04 6950.52,5094.52 6950.52,5073.04 7131.86,4891.71 7131.86,4850.04 7231.66,4750.23 U15.8@7294.41,4750.23 ; v1@6894.08,5116.15 cw(c6903.47,5106.76) 6903.47,5120.04 cw(c6903.47,5133.32) v1@6894.08,5123.93 ; v1@6896.91,5113.32 cw(c6913.13,5097.11) 6913.13,5120.04 cw(c6913.13,5142.98) v1@6896.91,5126.76 ; U15.8@7271.19,4744.58 ccw(c7257.54,4730.92) 7257.54,4750.23 ccw(c7257.54,4769.55) U15.8@7271.19,4755.89 ; 5636.61,4480.42 5643.03,4488.15 ccw(c5626.22,4504.96) 5649.99,4504.96 cw(c5665.59,4504.96) 5665.59,4520.56 ccw(c5665.59,4544.33) 5689.36,4544.33 cw(c5704.96,4544.33) 5704.96,4559.93 ccw(c5704.96,4583.7) 5728.73,4583.7 5728.73,4641.96 5728.73,4710 5728.73,4720 5728.73,4734.73 5763.16,4769.16 5784.31,4769.16 5806.86,4791.71 5823.52,4791.71 5860,4828.18
DB_SRAM2.D2: U8.C23 U15.9 | length 2892
  Top Layer w4: 5913.22,5070.07 cw(c5942.52,5040.76) v1@5942.52,5082.21 ; 5920.05,5076.9 cw(c5942.52,5054.42) v1@5942.52,5086.21 ; 5926.88,5083.73 cw(c5942.52,5068.08) v1@5942.52,5090.21 ; v1(5942.52,5091.71) 5934.86,5091.71 5890.19,5047.04 5890.19,4966.64 5901.14,4955.69 5903.38,4955.69 5913.81,4945.26 5913.81,4930.5 5896.02,4912.72 5896.02,4878.29 5890.19,4872.46 5890.19,4841.71 5848.52,4800.04 5848.52,4775.04 5834.22,4760.74 5834,4760.52 ; v1(6789.86,5005.37) 7018.19,5005.37 7056.86,4966.71 v1(7056.86,4832.37) ; v1@6793.75,5001.49 cw(c6803.14,4992.1) 6803.14,5005.37 cw(c6803.14,5018.65) v1@6793.75,5009.26 ; v1@6796.57,4998.66 cw(c6812.79,4982.44) 6812.79,5005.37 cw(c6812.79,5028.31) v1@6796.57,5012.09 ; v1@7050.14,4839.09 ccw(c7033.92,4855.31) 7056.86,4855.31 ccw(c7079.79,4855.31) v1@7063.57,4839.09 ; v1@7052.97,4836.26 ccw(c7043.58,4845.65) 7056.86,4845.65 ccw(c7070.14,4845.65) v1@7060.75,4836.26 ; 5776.55,4615.92 ccw(c5749.2,4643.27) 5787.88,4643.27 ; 5776.55,4615.92 ccw(c5749.2,4643.27) 5787.88,4643.27 ; 5776.55,4615.92 ccw(c5789.08,4603.39) 5771.36,4603.39 cw(c5789.08,4603.39) 5776.55,4615.92 ; 5776.55,4615.92 cw(c5764.02,4628.45) 5764.02,4610.73 ccw(c5764.02,4628.45) 5776.55,4615.92 ; 5787.88,4643.27 5787.88,4710 5787.88,4720 5787.88,4724.74 5787.88,4736.74 5789.88,4738.74 5800.14,4749 5822.48,4749 ; 5822.48,4749 5834,4760.52 ; 5822.48,4749 5834,4760.52
  MidLayer2 w4: v1(5942.52,5091.71) 5986.67,5091.71 5995,5100.04 6240.19,5100.04 v1(6298.52,5041.71) ; v1@5946.41,5087.82 cw(c5955.8,5078.43) 5955.8,5091.71 cw(c5955.8,5104.99) v1@5946.41,5095.6 ; v1@5949.24,5084.99 cw(c5965.46,5068.77) 5965.46,5091.71 cw(c5965.46,5114.64) v1@5949.24,5098.43 ; v1@6289.02,5041.71 ccw(c6266.09,5041.71) 6282.31,5057.93 ccw(c6298.52,5074.14) v1@6298.52,5051.21 ; v1@6293.02,5041.71 ccw(c6279.75,5041.71) 6289.14,5051.1 ccw(c6298.52,5060.49) v1@6298.52,5047.21
  Bottom Layer w4: v1(6298.52,5041.71) 6442.21,5041.71 6467.21,5066.71 6624.19,5066.71 6665.86,5025.04 6715.19,5025.04 6740.19,5000.04 6784.52,5000.04 v1(6789.86,5005.37) ; v1@6302.41,5037.82 cw(c6311.8,5028.43) 6311.8,5041.71 cw(c6311.8,5054.99) v1@6302.41,5045.6 ; v1@6305.24,5034.99 cw(c6321.46,5018.77) 6321.46,5041.71 cw(c6321.46,5064.64) v1@6305.24,5048.43 ; 6754.04,5000.04 ccw(c6754.04,5041.19) v1@6783.14,5012.09 ; 6763.7,5000.04 ccw(c6763.7,5031.53) v1@6785.97,5009.26 ; 6773.36,5000.04 ccw(c6773.36,5021.87) v1@6788.8,5006.44 ; v1@7054.36,4832.37 ccw(c7078.1,4832.37) 7061.31,4815.59 ; v1(7056.86,4832.37) 7056.86,4820.04 7158.16,4718.74 U15.9@7294.41,4718.74 ; v1@7058.36,4832.37 ccw(c7091.76,4832.38) 7068.14,4808.76 ; v1@7062.36,4832.37 ccw(c7105.41,4832.38) 7074.97,4801.93 ; v1@7066.36,4832.37 ccw(c7119.07,4832.38) 7081.8,4795.1 ; U15.9@7271.19,4713.08 ccw(c7257.54,4699.42) 7257.54,4718.74 ccw(c7257.54,4738.05) U15.9@7271.19,4724.4
DB_SRAM2.D3: U8.H17 U15.10 | length 2767
  Top Layer w4: U8.H17@5527.8,4406.54 v3(5547.48,4426.22) ; U8.H17@5527.8,4413.88 ccw(c5527.8,4431.6) 5540.33,4419.07 ccw(c5552.86,4406.54) U8.H17@5535.14,4406.54 ; U8.H17@5527.8,4414.04 ccw(c5527.8,4432.14) 5540.6,4419.34 ccw(c5553.4,4406.54) U8.H17@5535.3,4406.54 ; 5534.68,4413.42 cw(c5547.48,4400.61) 5547.48,4418.72 ccw(c5547.48,4400.61) 5534.68,4413.42 ; 5534.68,4413.42 ccw(c5521.87,4426.22) 5539.98,4426.22 cw(c5521.87,4426.22) 5534.68,4413.42
  MidLayer1 w4: v1@6573.52,4782.21 cw(c6573.52,4759.27) 6589.74,4775.49 cw(c6605.96,4791.71) v1@6583.02,4791.71 ; v1@6573.52,4786.21 cw(c6573.52,4772.93) 6582.91,4782.32 cw(c6592.3,4791.71) v1@6579.02,4791.71 ; v1(6573.52,4791.71) 6647.52,4717.71 6765.19,4717.71 6791.19,4691.71 6840.19,4691.71 6856.86,4708.37 7131.86,4708.37 v1(7140.19,4700.04)
  MidLayer2 w4: v3@5546.83,4433.69 ccw(c5545.25,4451.73) 5559.12,4440.09 ; v3@5554.95,4426.87 cw(c5572.99,4428.45) 5559.12,4440.09 ; 5571.34,4699.16 5571.34,4640.9 ; v1@6564.02,4791.71 ccw(c6541.09,4791.71) 6557.31,4807.93 ccw(c6573.52,4824.14) v1@6573.52,4801.21 ; v1@6568.02,4791.71 ccw(c6554.75,4791.71) 6564.14,4801.1 ccw(c6573.52,4810.49) v1@6573.52,4797.21 ; v1(6573.52,4791.71) 6548.52,4816.71 6515.54,4816.71 6415.54,4716.71 6090.19,4716.71 6081.86,4725.04 6081.86,4738.04 6002.52,4817.37 5924.13,4817.37 5866.46,4875.04 5851.88,4875.04 5835.21,4891.71 5714.48,4891.71 5614.78,4792 5573.31,4792 5571.34,4790.03 5571.34,4720 5571.34,4710 5571.34,4640.9 ; 5559.12,4440.09 ccw(c5529.61,4469.6) 5571.34,4469.6 5571.34,4489.1 5571.34,4563.22 5571.34,4582.64 5571.34,4640.9
  Bottom Layer w4: v1(7140.19,4700.04) 7196.67,4700.04 7205,4691.71 7276.84,4691.71 7276.84,4687.24 U15.10@7294.41,4687.24 ; v1@7144.08,4696.15 cw(c7153.47,4686.76) 7153.47,4700.04 cw(c7153.47,4713.32) v1@7144.08,4703.93 ; v1@7146.91,4693.32 cw(c7163.13,4677.11) 7163.13,4700.04 cw(c7163.13,4722.98) v1@7146.91,4706.76 ; 7246.76,4691.71 cw(c7246.76,4657.15) U15.10@7271.19,4681.59 ; 7256.41,4691.71 cw(c7256.41,4666.81) U15.10@7274.02,4684.41 ; 7266.07,4691.71 cw(c7266.07,4676.46) U15.10@7276.85,4687.24
DB_SRAM2.D4: U8.K16 U15.13 | length 3427.5
  Top Layer w4: U8.K16@5488.43,4327.8 v3(5508.11,4347.48) ; U8.K16@5488.43,4335.14 ccw(c5488.43,4352.86) 5500.96,4340.33 ccw(c5513.49,4327.8) U8.K16@5495.77,4327.8 ; U8.K16@5488.43,4335.3 ccw(c5488.43,4353.4) 5501.23,4340.6 ccw(c5514.03,4327.8) U8.K16@5495.93,4327.8 ; v1@7100.14,4697.09 ccw(c7083.92,4713.31) 7106.86,4713.31 ccw(c7129.79,4713.31) v1@7113.57,4697.09 ; v1@7102.97,4694.26 ccw(c7093.58,4703.65) 7106.86,4703.65 ccw(c7120.14,4703.65) v1@7110.75,4694.26 ; v1(7106.86,4690.37) 7106.86,4816.71 7140.19,4850.04 7140.19,5017.71 v1(7116.19,5041.71) ; v1@7116.19,5032.21 cw(c7116.19,5009.27) 7132.41,5025.49 cw(c7148.63,5041.71) v1@7125.69,5041.71 ; v1@7116.19,5036.21 cw(c7116.19,5022.93) 7125.58,5032.32 cw(c7134.97,5041.71) v1@7121.69,5041.71 ; 5495.31,4334.68 cw(c5508.11,4321.87) 5508.11,4339.98 ccw(c5508.11,4321.87) 5495.31,4334.68 ; 5495.31,4334.68 ccw(c5482.5,4347.48) 5500.61,4347.48 cw(c5482.5,4347.48) 5495.31,4334.68
  MidLayer1 w4: v1@5575.48,4940.42 ccw(c5562.48,4954.79) 5581.86,4954.79 ; v1@5578.17,4937.45 ccw(c5570.64,4945.77) 5581.86,4945.77 ccw(c5593.08,4945.77) v1@5585.55,4937.45 ; v1(5581.86,4933.37) 5581.86,4954.79 ; v1@5588.23,4940.42 cw(c5601.23,4954.79) 5581.86,4954.79 ; v1@7109.47,5034.99 ccw(c7093.26,5018.77) 7093.26,5041.71 ccw(c7093.26,5064.64) v1@7109.47,5048.43 ; v1@7112.3,5037.82 ccw(c7102.91,5028.43) 7102.91,5041.71 ccw(c7102.91,5054.99) v1@7112.3,5045.6 ; v1(7116.19,5041.71) 6931.86,5041.71 6913.86,5023.71 6872.48,5023.71 6837.82,5058.37 6729.48,5058.37 6662.82,5125.04 6540.19,5125.04 6523.52,5108.37 6006.86,5108.37 5915.19,5016.71 5643.78,5016.71 5619.95,4992.88 5581.86,4954.79
  Bottom Layer w4: v3@5507.46,4354.95 ccw(c5505.88,4372.99) 5519.75,4361.35 ; v3@5515.58,4348.13 cw(c5533.62,4349.71) 5519.75,4361.35 ; v1@5572.36,4933.37 cw(c5549.42,4933.37) 5565.64,4917.16 cw(c5581.86,4900.94) v1@5581.86,4923.87 ; v1@5576.36,4933.37 cw(c5563.08,4933.37) 5572.47,4923.99 cw(c5581.86,4914.6) v1@5581.86,4927.87 ; v1(5581.86,4933.37) 5520.5,4872.02 5520.5,4839.02 5510.86,4829.37 5510.86,4789.71 5531.97,4768.59 5531.97,4724.74 5531.97,4720 5531.97,4710 5531.97,4503.9 5531.97,4484.48 5531.97,4410.36 5531.97,4390.86 cw(c5490.24,4390.86) 5519.75,4361.35 ; v1@7106.86,4680.87 cw(c7106.86,4657.94) 7123.07,4674.16 cw(c7139.29,4690.37) v1@7116.36,4690.37 ; v1@7106.86,4684.87 cw(c7106.86,4671.6) 7116.25,4680.99 cw(c7125.64,4690.37) v1@7112.36,4690.37 ; v1(7106.86,4690.37) 7204.48,4592.75 U15.13@7294.41,4592.75 ; U15.13@7271.19,4587.1 ccw(c7257.54,4573.44) 7257.54,4592.75 ccw(c7257.54,4612.07) U15.13@7271.19,4598.41
DB_SRAM2.D5: U8.H20 U15.14 | length 2217.7
  Top Layer w4: U8.H20@5645.91,4406.54 v3(5665.59,4426.22) ; U8.H20@5645.91,4413.88 ccw(c5645.91,4431.6) 5658.44,4419.07 ccw(c5670.97,4406.54) U8.H20@5653.25,4406.54 ; U8.H20@5645.91,4414.04 ccw(c5645.91,4432.14) 5658.71,4419.34 ccw(c5671.51,4406.54) U8.H20@5653.41,4406.54 ; 5652.79,4413.42 cw(c5665.59,4400.61) 5665.59,4418.72 ccw(c5665.59,4400.61) 5652.79,4413.42 ; 5652.79,4413.42 ccw(c5639.98,4426.22) 5658.09,4426.22 cw(c5639.98,4426.22) 5652.79,4413.42
  MidLayer2 w4: v1(6047.52,4609.37) 6291.19,4609.37 6307.52,4625.71 6640.86,4625.71 6652.86,4637.71 6715.19,4637.71 6761.19,4591.71 7210.86,4591.71 v1(7235.86,4566.71) ; v1@6051.41,4605.49 cw(c6060.8,4596.1) 6060.8,4609.37 cw(c6060.8,4622.65) v1@6051.41,4613.26 ; v1@6054.24,4602.66 cw(c6070.46,4586.44) 6070.46,4609.37 cw(c6070.46,4632.31) v1@6054.24,4616.09 ; v1@7226.36,4566.71 ccw(c7203.42,4566.71) 7219.64,4582.93 ccw(c7235.86,4599.14) v1@7235.86,4576.21 ; v1@7230.36,4566.71 ccw(c7217.08,4566.71) 7226.47,4576.1 ccw(c7235.86,4585.49) v1@7235.86,4572.21
  Bottom Layer w4: v3@5666.89,4433.61 ccw(c5670.04,4451.44) 5680.42,4436.61 ; v3@5672.98,4424.92 cw(c5690.81,4421.77) 5680.42,4436.61 ; v1@6041.03,4602.44 cw(c6027.04,4587.48) 6047.52,4587.48 ; v1@6043.77,4605.36 cw(c6035.66,4596.7) 6047.52,4596.7 cw(c6059.39,4596.7) v1@6051.28,4605.36 ; v1(6047.52,4609.37) 6047.52,4587.48 ; v1@6054.01,4602.44 ccw(c6068.01,4587.48) 6047.52,4587.48 ; v1(7235.86,4566.71) 7255.74,4566.71 ; v1@7240.14,4563.25 cw(c7247.37,4557.41) 7247.37,4566.71 cw(c7247.37,4576) v1@7240.14,4570.16 ; v1@7243.25,4560.74 cw(c7255.74,4550.65) 7255.74,4566.71 ; v1@7243.25,4572.68 ccw(c7255.74,4582.77) 7255.74,4566.71 ; U15.14@7270.37,4556.57 ccw(c7261.19,4549.93) 7261.19,4561.26 ; U15.14@7270.37,4565.95 cw(c7261.19,4572.59) 7261.19,4561.26 ; U15.14@7294.41,4561.26 7261.19,4561.26 ; 5680.42,4436.61 5688.15,4443.03 cw(c5704.96,4426.22) 5704.96,4449.99 ccw(c5704.96,4465.59) 5720.56,4465.59 cw(c5744.33,4465.59) 5744.33,4489.36 ccw(c5744.33,4504.96) 5759.93,4504.96 cw(c5783.7,4504.96) 5783.7,4528.73 5841.96,4528.73 5900.22,4528.73 5910,4528.73 5920,4528.73 5936.27,4528.73 5970,4495 6010,4495 6040,4525 6040,4551.35 6050,4561.35 6050,4585 6047.52,4587.48 ; 7255.74,4566.71 7261.19,4561.26
DB_SRAM2.D6: U8.F23 U15.15 | length 2107.3
  Top Layer w4: U8.F23@5764.02,4485.28 v3(5783.7,4504.96) ; U8.F23@5764.02,4492.62 ccw(c5764.02,4510.34) 5776.55,4497.81 ccw(c5789.08,4485.28) U8.F23@5771.36,4485.28 ; U8.F23@5764.02,4492.78 ccw(c5764.02,4510.88) 5776.82,4498.08 ccw(c5789.62,4485.28) U8.F23@5771.52,4485.28 ; 5770.9,4492.16 cw(c5783.7,4479.35) 5783.7,4497.46 ccw(c5783.7,4479.35) 5770.9,4492.16 ; 5770.9,4492.16 ccw(c5758.09,4504.96) 5776.2,4504.96 cw(c5758.09,4504.96) 5770.9,4492.16
  MidLayer1 w4: v3(5783.7,4504.96) 5861.38,4504.96 5910,4504.96 5920,4504.96 5933.44,4504.96 5941.02,4512.54 6005.06,4512.54 6034.56,4542.04 6053.52,4542.04 v1(6066.19,4554.71) ; v3@5788.89,4499.77 cw(c5801.43,4487.23) 5801.43,4504.96 cw(c5801.43,4522.69) v3@5788.89,4510.15 ; 5801.81,4504.96 cw(c5801.81,4523.07) 5789,4510.26 ccw(c5801.81,4523.07) 5801.81,4504.96 ; 5801.81,4504.96 ccw(c5801.81,4486.85) 5789,4499.66 cw(c5801.81,4486.85) 5801.81,4504.96
  MidLayer2 w4: v1@6064.42,4556.48 cw(c6081.88,4539.02) 6081.88,4563.71 ; v1(6066.19,4554.71) 6075.19,4563.71 6170.52,4563.71 6206.86,4600.04 6307.86,4600.04 6325.52,4617.71 6589.19,4617.71 6665.19,4541.71 6890.19,4541.71 6898.52,4550.04 v1(7183.19,4550.04) ; v1@6067.25,4553.65 cw(c6091.54,4529.36) 6091.54,4563.71 ; v1@6070.08,4550.82 cw(c6101.2,4519.7) 6101.2,4563.71 ; v1@6072.91,4547.99 cw(c6110.85,4510.04) 6110.85,4563.71 ; v1@7176.47,4543.32 ccw(c7160.26,4527.11) 7160.26,4550.04 ccw(c7160.26,4572.98) v1@7176.47,4556.76 ; v1@7179.3,4546.15 ccw(c7169.91,4536.76) 7169.91,4550.04 ccw(c7169.91,4563.32) v1@7179.3,4553.93
  Bottom Layer w4: v1(7183.19,4550.04) 7190.19,4550.04 7206.86,4533.37 7294.41,4533.37 7298.52,4533.37 7298.52,4529.76 U15.15@7294.41,4529.76 ; v1@7183.23,4548.54 cw(c7183.8,4529.53) 7197.25,4542.98 ; v1@7183.35,4544.54 cw(c7184.18,4516.8) 7203.8,4536.43 ; v1@7192.69,4550.04 ccw(c7198.73,4550.04) 7194.46,4545.77 ; 7248.82,4533.37 cw(c7248.82,4501.73) U15.15@7271.19,4524.11 ; 7258.47,4533.37 cw(c7258.47,4511.39) U15.15@7274.02,4526.93 ; 7266.26,4533.37 ccw(c7266.26,4540.36) U15.15@7271.19,4535.42
DB_SRAM2.D7: U8.K9 U15.16 | length 5984.2
  Top Layer w4: v4@4568.06,5153.06 cw(c4551.31,5136.31) 4575,5136.31 cw(c4598.69,5136.31) v4@4581.94,5153.06 ; v4@4570.89,5155.89 cw(c4560.97,5145.97) 4575,5145.97 cw(c4589.03,5145.97) v4@4579.11,5155.89 ; v4@4573.52,5158.52 v4(4575,5160) 4575,4980 4575,4915 4605,4885 4605,4810.23 v1(4654.19,4761.04) ; v1@4644.69,4761.04 ccw(c4621.76,4761.04) 4637.97,4777.26 ccw(c4654.19,4793.48) v1@4654.19,4770.54 ; v1@4648.69,4761.04 ccw(c4635.41,4761.04) 4644.8,4770.43 ccw(c4654.19,4779.82) v1@4654.19,4766.54 ; v3(5193.15,4347.48) U8.K9@5212.83,4327.8 ; U8.K9@5205.33,4327.8 ccw(c5187.23,4327.8) 5200.03,4340.6 ccw(c5212.83,4353.4) U8.K9@5212.83,4335.3 ; U8.K9@5205.49,4327.8 ccw(c5187.77,4327.8) 5200.3,4340.33 ccw(c5212.83,4352.86) U8.K9@5212.83,4335.14 ; 5205.95,4334.68 ccw(c5193.15,4321.87) 5193.15,4339.98 cw(c5193.15,4321.87) 5205.95,4334.68 ; 5205.95,4334.68 cw(c5218.76,4347.48) 5200.65,4347.48 ccw(c5218.76,4347.48) 5205.95,4334.68
  MidLayer2 w4: v4(4675,5160) 4742.21,5160 4819.4,5237.19 5095.65,5237.19 5108.29,5224.54 5197.04,5224.54 5255.71,5165.87 5285.87,5165.87 5395.87,5275.87 5609.13,5275.87 5626.96,5258.04 5718.31,5258.04 5751.98,5224.37 6591.34,5224.37 6654.02,5161.69 6654.02,4927.46 6665.11,4916.37 6710.5,4916.37 6720,4925.87 6740.11,4925.87 6793.11,4872.87 6802.77,4872.87 6838.44,4837.21 6917.79,4837.21 6926.85,4828.15 6926.85,4813.15 6932.5,4807.5 7111.49,4807.5 7171.2,4867.21 7247.46,4867.21 7255.25,4875 7489.19,4875 7499.19,4865 v4(7525,4865) ; v4@4679.11,5155.89 cw(c4689.03,5145.97) 4689.03,5160 cw(c4689.03,5174.03) v4@4679.11,5164.11 ; v4@4681.94,5153.06 cw(c4698.69,5136.31) 4698.69,5160 cw(c4698.69,5183.69) v4@4681.94,5166.94 ; v4@7518.06,4858.06 ccw(c7501.31,4841.31) 7501.31,4865 ccw(c7501.31,4888.69) v4@7518.06,4871.94 ; v4@7520.89,4860.89 ccw(c7510.97,4850.97) 7510.97,4865 ccw(c7510.97,4879.03) v4@7520.89,4869.11
  Bottom Layer w4: v4(4575,5160) v4(4675,5160) ; v4@4579.11,5155.89 cw(c4589.03,5145.97) 4589.03,5160 cw(c4589.03,5174.03) v4@4579.11,5164.11 ; v4@4581.94,5153.06 cw(c4598.69,5136.31) 4598.69,5160 cw(c4598.69,5183.69) v4@4581.94,5166.94 ; v1@4647.67,4754.13 cw(c4633.43,4739.02) 4654.19,4739.02 ; v1@4650.42,4757.04 cw(c4642.17,4748.29) 4654.19,4748.29 cw(c4666.21,4748.29) v1@4657.96,4757.04 ; v1(4654.19,4761.04) 4654.19,4739.02 ; v1@4660.71,4754.13 ccw(c4674.95,4739.02) 4654.19,4739.02 ; v4@4668.06,5153.06 ccw(c4651.31,5136.31) 4651.31,5160 ccw(c4651.31,5183.69) v4@4668.06,5166.94 ; v4@4670.89,5155.89 ccw(c4660.97,5145.97) 4660.97,5160 ccw(c4660.97,5174.03) v4@4670.89,5164.11 ; 5179.57,4358.87 ccw(c5169.64,4348.94) 5169.64,4362.99 5076.1,4362.99 4870,4362.99 4860,4362.99 4777.99,4362.99 4755.37,4340.37 4713.19,4340.37 4703.52,4350.04 4703.52,4441.04 4656.86,4487.71 4656.86,4736.36 4654.19,4739.02 ; v3@5185.68,4346.83 ccw(c5167.64,4345.25) 5179.28,4359.12 ccw(c5190.92,4372.99) v3@5192.5,4354.95 ; U15.16@7294.41,4498.27 7306.86,4498.27 7306.86,4500.04 7348.52,4500.04 7365.19,4516.71 7365.19,4563.37 7373.52,4571.71 7406.86,4571.71 7456.86,4621.71 7456.86,4725.04 7525,4793.18 v4(7525,4865) ; U15.16@7314.8,4495.44 cw(c7325.91,4484.33) 7325.91,4500.04 ; U15.16@7317.63,4492.61 cw(c7335.57,4474.67) 7335.57,4500.04 ; U15.16@7317.63,4503.92 ccw(c7327,4513.3) 7327,4500.04 ; v4@7518.06,4858.06 cw(c7501.31,4841.31) 7525,4841.31 cw(c7548.69,4841.31) v4@7531.94,4858.06 ; v4@7520.89,4860.89 cw(c7510.97,4850.97) 7525,4850.97 cw(c7539.03,4850.97) v4@7529.11,4860.89